# Altium PCB FURNACE.PcbDoc (part 2 of 2)
Units mm, origin at the board's own origin, x right, y up, seen from the top; angles counter-clockwise.
Board outline 97.9 x 85.9 mm, 2 copper layers (Top Layer, Bottom Layer); 165 components, 104 nets, 476 pads, 472 vias.
Unrouted connection lines stored in the file: 26.
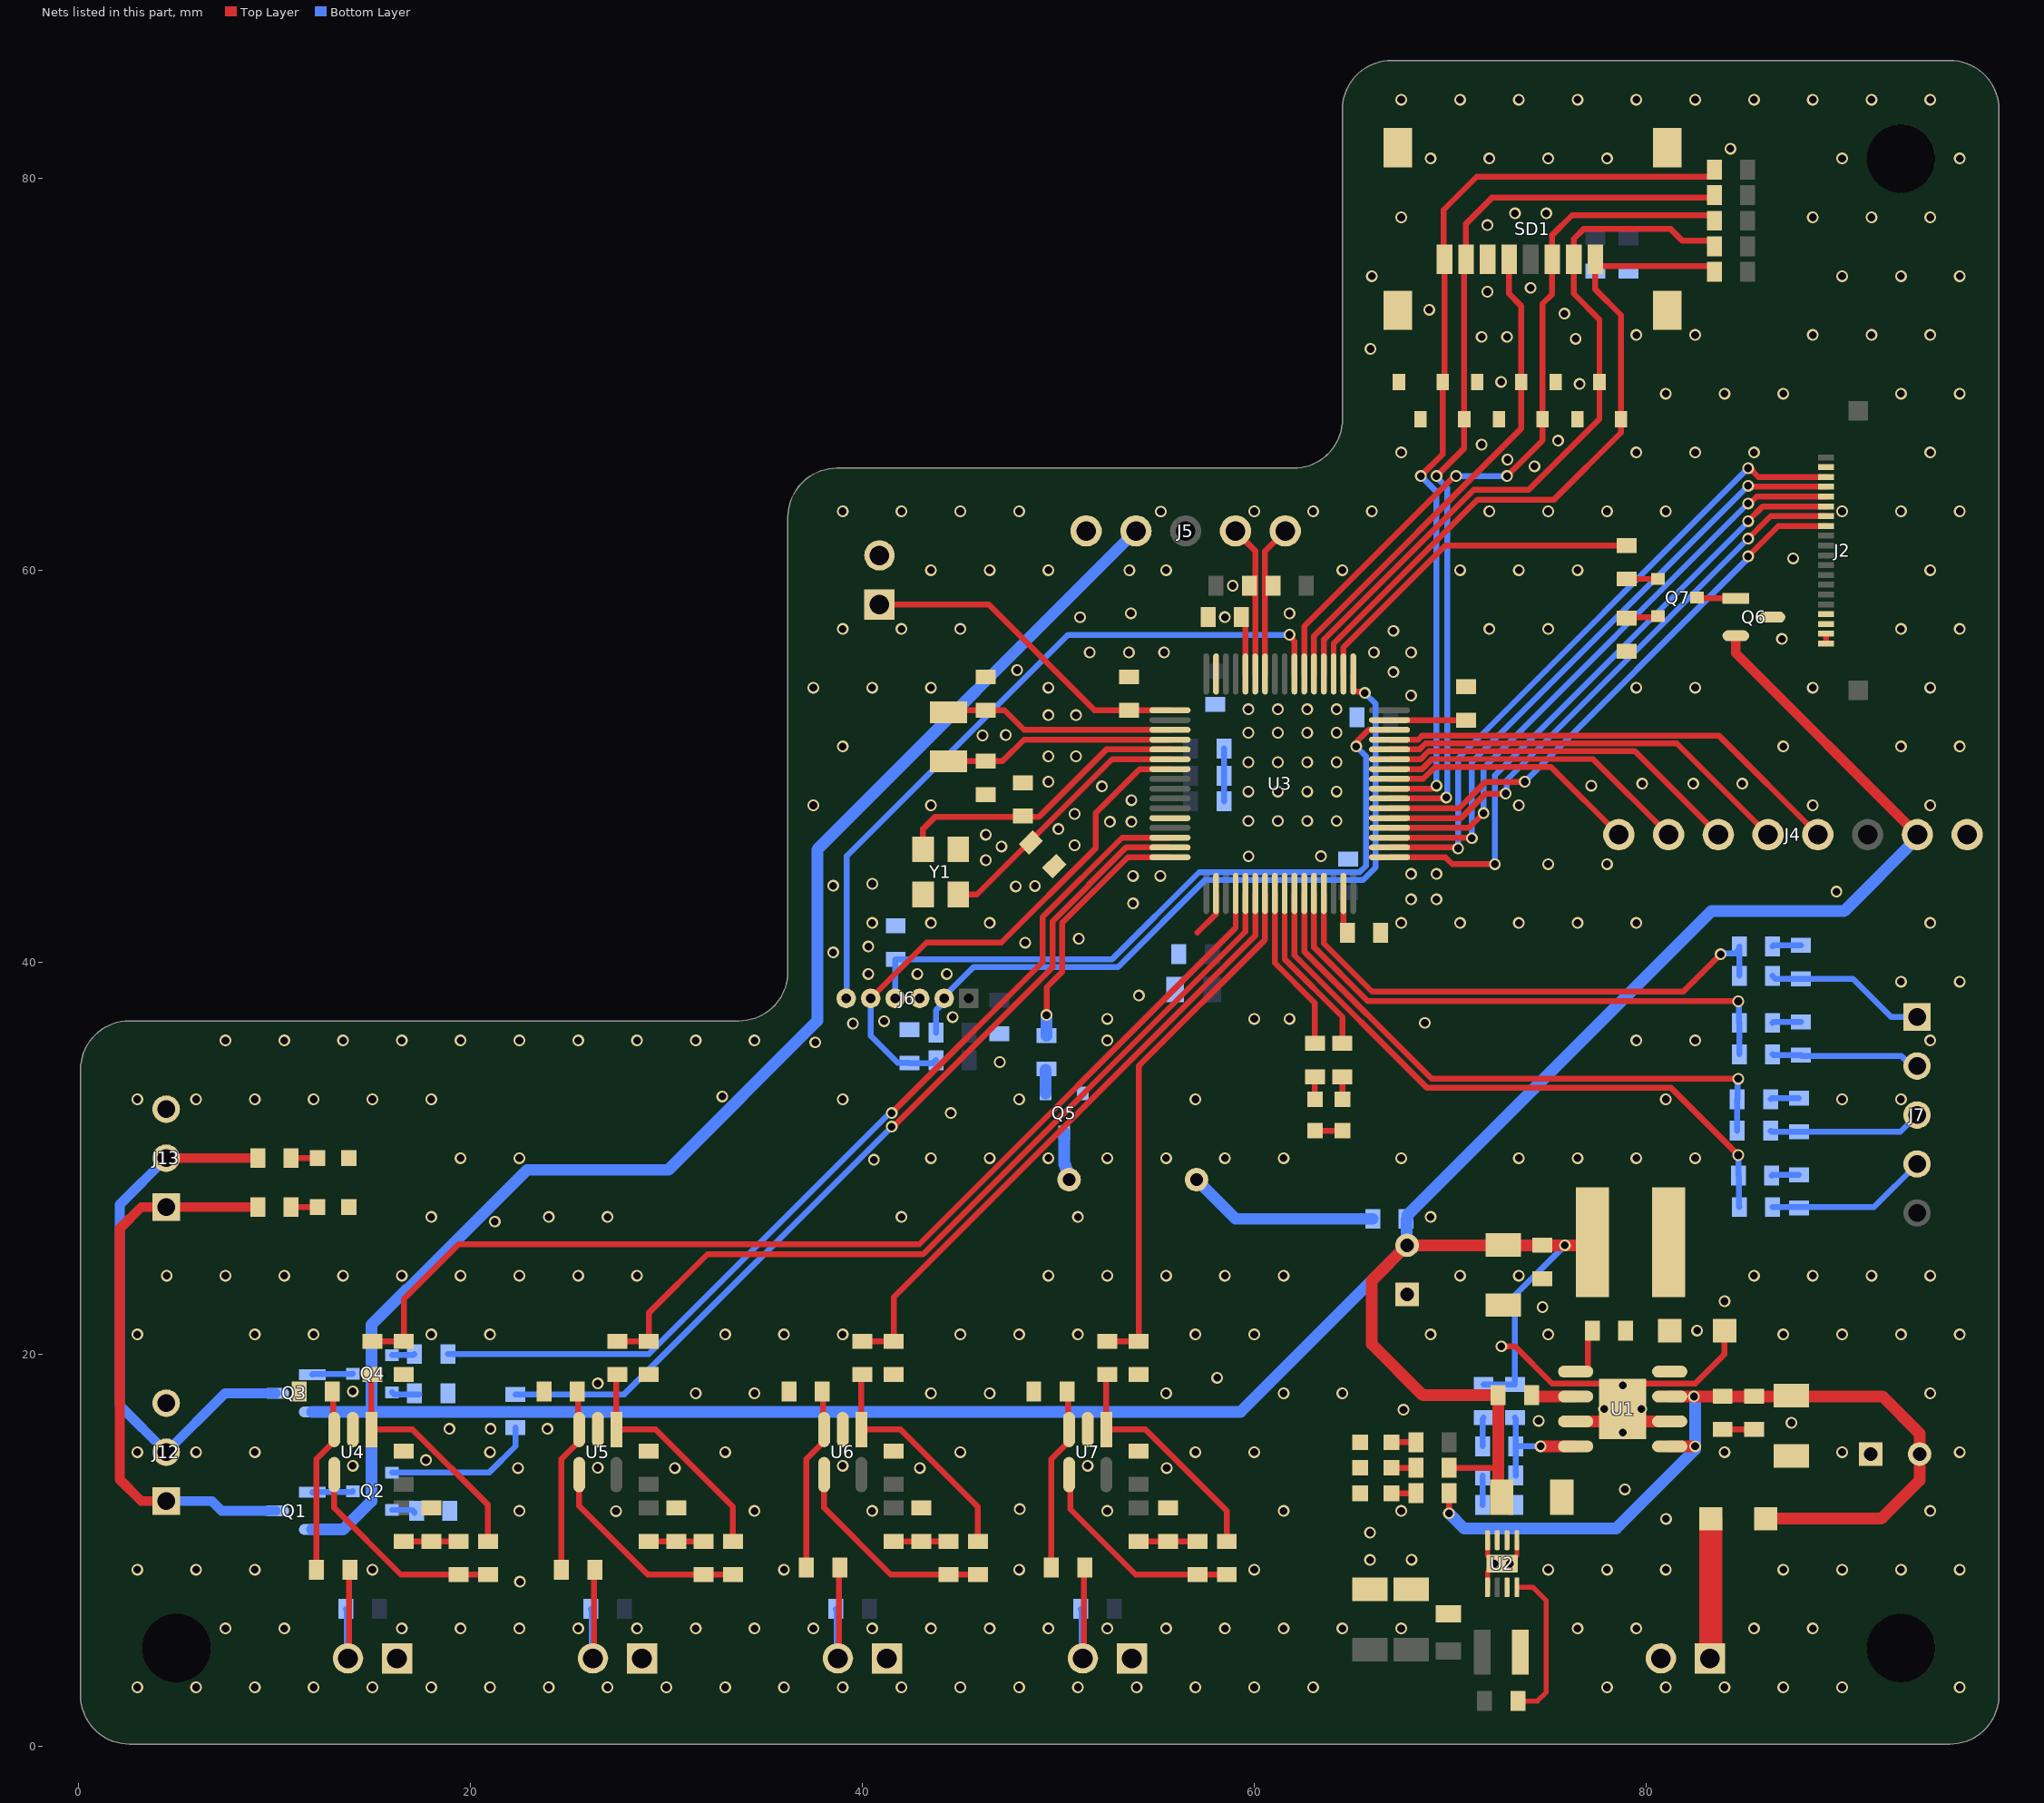
[diagram p2: the nets of this part, all layers, seen from the top]

## Via types
v1: diameter 0.6, hole 0.4, Top Layer to Bottom Layer, tented both sides, 472 vias

## Nets (pads, with @x,y where several pads share a name; then routed paths per layer and width w, separated by ;. In a path a pad name is that pad's centre, name@x,y a point inside that pad or via, vN(x,y) a via of type N, cw(c..) or ccw(c..) an arc to the next point about the centre after c; other vN are vias at no path point) (continued)
5V: C2.2 C4.2 C8.1 C9.1 C10.1 J4.7 J5.4 L1.2 Q1.2 Q3.2 Q6.2 R2.2 R3.2 R8.2 R69.1 U2.2 U2.3 | length 223.4
  Top Layer w0.3: R8.2@69.95,14.2 72.45,14.2 ; C10.1@72.4,12.475 C10.1@72.625,12.7
  Top Layer w0.5: Q6.2@84.575,56.65 84.575,55.765 J4.7@93.84,46.5
  Top Layer w0.6: C10.1@72.725,12.7 72.45,12.975 72.45,14.2 R3.2@72.45,17.9 68.6,17.9 66,20.5 66,23.75 C4.2@67.8,25.55 C8.1@74.7,25.55 75.85,25.55 v1(75.851,25.549) 77.099,25.549 L1.2@77.25,25.7
  Bottom Layer w0.3: R2.2@71.7,18.45 C2.2@73.3,18.45 73.3,22.997 v1(75.851,25.549)
  Bottom Layer w0.6: Q1.2@11.925,11.05 13.5,11.05 14.95,12.5 14.95,17.05 ; Q3.2@11.925,17.05 14.95,17.05 ; J5.4@53.96,62 37.7,45.74 37.7,37 30.1,29.4 22.89,29.4 16.79,23.3 16.75,23.3 14.95,21.5 14.95,17.05 ; J4.7@93.84,46.5 93.84,46.34 90.1,42.6 83.323,42.6 67.831,27.108 67.831,26.931 67.775,26.875 67.775,25.575 C4.2@67.8,25.55 59.3,17.05 14.95,17.05
BACKLIGHT_LCD: J2.3 J2.4 Q6.3
BACKLIGHT_SIGNAL: R71.1 U3.50 | length 18
  Top Layer w0.3: U3.50@64.55,54.7 64.55,56.05 69.75,61.25 R71.1@79,61.25
BUTTON1: J7.4 R18.1 R19.2 | length 8.3
  Bottom Layer w0.3: R18.1@86.45,27.5 91.625,27.5 J7.4@93.825,29.7
BUTTON2: J7.3 R20.1 R21.2 | length 7.8
  Bottom Layer w0.3: R20.1@86.35,31.4 86.4,31.35 R21.2@87.8,31.35 92.975,31.35 J7.3@93.825,32.2
BUTTON3: J7.2 R22.1 R23.2 | length 7.6
  Bottom Layer w0.3: R22.1@86.45,35.3 86.5,35.25 R23.2@87.9,35.25 87.95,35.2 93.027,35.2 93.527,34.7 J7.2@93.825,34.7
BUTTON4: J7.1 R24.1 R25.2 | length 8.2
  Bottom Layer w0.3: R24.1@86.45,39.3 86.6,39.15 R25.2@87.9,39.15 90.55,39.15 92.401,37.299 92.5,37.2 J7.1@93.825,37.2
CLK: D10.1 SD1.5 U3.53 | length 25.8
  Top Layer w0.3: U3.53@63.05,54.7 63.05,56.65 73.615,67.215 D10.1@73.615,69.6 73.615,73.485 73.005,74.095 SD1.5@73.005,75.85
CMD: D13.1 R66.1 SD1.3 U3.54 | length 38
  Top Layer w0.3: U3.54@62.55,54.7 62.55,57.131 70.219,64.8 v1(70.3,64.8) ; v1(72.9,64.8) 74.715,66.615 D13.1@74.715,67.7 74.715,73.59 75.205,74.08 SD1.3@75.205,75.85 75.205,77.095 76.21,78.1 83.244,78.1 83.475,77.869 R66.1@83.475,77.825
  Bottom Layer w0.3: v1(70.3,64.8) v1(72.9,64.8)
DAT0: D12.1 R65.1 SD1.7 U3.39 | length 46.3
  Top Layer w0.3: U3.39@66.9,48.35 69.75,48.35 v1(69.8,48.4) ; v1(69.3,64.8) 70.715,66.215 70.715,75.76 SD1.7@70.805,75.85 70.805,77.68 72.125,79 83.35,79 R65.1@83.475,79.125
  Bottom Layer w0.3: v1(69.3,64.8) 69.3,64.739 69.85,64.189 69.85,48.45 v1(69.8,48.4)
DAT1: D11.1 R64.1 SD1.8 U3.40 | length 47.5
  Top Layer w0.3: U3.40@66.9,48.85 69.069,48.85 69.219,49 v1(69.3,49) ; v1(68.5,64.8) 69.615,65.915 69.615,69.51 69.705,69.6 SD1.8@69.705,75.85 SD1.8@69.615,75.76 ; SD1.8@69.66,75.85 69.66,78.385 71.35,80.075 83.244,80.075 83.475,80.306 R64.1@83.475,80.425
  Bottom Layer w0.3: v1(68.5,64.8) 69.3,64 v1(69.3,49)
DAT2: D15.1 R68.1 SD1.1 U3.51 | length 36.5
  Top Layer w0.3: U3.51@64.05,54.7 64.05,56.25 71.4,63.6 75.3,63.6 78.711,67.011 78.711,67.696 D15.1@78.715,67.7 78.715,73.01 77.405,74.32 SD1.1@77.405,75.85 77.405,75.75 77.655,75.5 83.244,75.5 83.475,75.269 R68.1@83.475,75.225
DAT3: D14.1 R67.1 SD1.2 U3.52 | length 38
  Top Layer w0.3: U3.52@63.55,54.7 63.55,56.45 71.2,64.1 74,64.1 77.615,67.715 D14.1@77.615,69.6 77.615,72.785 76.305,74.095 SD1.2@76.305,75.85 76.305,76.905 76.8,77.4 81.25,77.4 81.85,76.8 83.244,76.8 83.475,76.569 R67.1@83.475,76.525
FAN_OUT: J12.2 J13.2 Q3.3 R62.2 | length 28.5
  Top Layer w0.5: J13.2@4.475,30 R62.2@9.15,30
  Bottom Layer w0.5: J13.2@4.475,30 2.1,27.625 2.1,17.375 J12.2@4.475,15 7.475,18 Q3.3@10.075,18
GND: C3.1 C4.1 C5.2 C6.2 C7.2 C8.2 C9.2 C10.2 C11.2 C12.2 C13.2 C14.2 C15.2 C16.2 C17.2 C18.2 C19.2 C20.2 C21.2 C22.2 C23.2 C24.2 C25.2 C26.2 C27.2 C28.2 C29.2 C30.2 C31.2 C32.2 C33.2 C34.2 C35.2 C36.2 C37.2 C38.2 C39.2 C40.2 C41.2 C42.2 C43.2 C44.2 D2.2 D3.2 D4.2 D5.2 D6.2 D7.2 D8.2 D9.2 D10.2 D11.2 D12.2 D13.2 D14.2 D15.2 J1.2 J2.1 J2.2 J2.19 J3.2 J4.8 J5.5 J6.3 J8.1 J9.1 J10.1 J11.1 J12.3 J13.3 Q5.2 R5.1 R14.1 R17.1 R19.1 R21.1 R23.1 R25.1 R30.1 R33.1 R38.1 R41.1 R46.1 R49.1 R54.1 R57.1 R60.1 R63.1 R72.1 SD1.6 SD1.9 SD1.10 SD1.11 SD1.12 U1.3 U1.6 U1.9 U2.1 U2.4 U2.5 U2.9 U3.12 U3.18 U3.63 U4.2 U5.2 U6.2 U7.2 Y1.2 Y1.4 | length 37.7
  Top Layer w0.25: U2.5@71.9,8.1 71.9,8.519 71.9,8.9 72.25,9.25 v1(72.25,9.3) 72.25,9.35 71.9,9.7 U2.4@71.9,10.5 ; U2.9@73.057,9.357 73.4,9.7 U2.1@73.4,10.5
  Top Layer w0.3: 57.1,41.5 58.05,42.45 U3.18@58.05,43.5 ; D7.2@63.1,31.4 D6.2@64.5,31.4 ; v1(72.61,20.395) 73.305,20.395 75.2,18.5 78.8,18.5 82.5,18.5 84,20 D2.2@84,21.2 ; U1.9@78.165,16.565 U1.9@78.8,17.2 U1.9@79.435,16.565 ; C7.2@83.9,16.15 C6.2@85.5,16.15 ; J2.1@89.176,56.25 J2.2@89.176,56.75
  Top Layer w0.6: U1.3@76.4,16.565 U1.9@78.165,16.565 ; U1.9@79.435,16.565 U1.6@81.2,16.565
  Bottom Layer w0.3: C30.2@58.45,48.2 C29.2@58.45,49.5 C28.2@58.45,50.9 ; C32.2@86.35,33 86.4,33.05 R21.1@87.8,33.05 ; C31.2@86.4,29.1 86.45,29.15 R19.1@87.8,29.15 ; C33.2@86.45,36.9 86.5,36.95 R23.1@87.9,36.95 ; C34.2@86.45,40.8 86.5,40.85 R25.1@87.9,40.85
  other v1: 3,3 6,3 9,3 12,3 15,3 18,3 21,3 24,3 27,3 30,3 33,3 36,3 39,3 42,3 45,3 48,3 51,3 54,3 57,3 60,3 63,3 78,3 81,3 84,3 87,3 90,3 96,3 7.5,6 10.5,6 16.5,6 19.5,6 22.5,6 25.5,6 28.5,6 31.5,6 34.5,6 37.5,6 40.5,6 43.5,6 46.5,6 49.5,6 52.5,6 55.5,6 58.5,6 61.5,6 64.5,6 67.5,6 76.5,6 79.5,6 85.5,6 88.5,6 22.529,8.388 3,9 6,9 9,9 15,9 36,9 48,9 60,9 75,9 78,9 81,9 87,9 90,9 93,9 96,9 73.05,9.3 65.91,9.495 68.024,9.512 65.91,10.895 81.01,11.595 22.5,12 27.429,11.988 34.5,12 40.5,12 52.5,12 61.5,12 67.5,12 94.5,12 48.029,12.088 78.91,13.095 22.429,14.188 26.5,14.2 30.429,14.188 42.929,14.188 55.529,14.188 14,14.3 39,14.3 51.5,14.3 17.729,14.588 3,15 6,15 9,15 21,15 33,15 45,15 57,15 60,15 84,15 90,15 96,15 78.8,16 18.929,16.188 21.029,16.188 23.929,16.188 87.41,16.495 74.51,16.595 67.613,17.16 77.85,17.2 79.75,17.2 31.5,18 34.5,18 43.5,18 46.5,18 55.5,18 61.5,18 64.5,18 94.5,18 14,18.1 78.8,18.4 26.5,18.5 58.11,18.795 3,21 9,21 12,21 18,21 21,21 33,21 36,21 39,21 45,21 48,21 51,21 57,21 60,21 69,21 75,21 87,21 90,21 93,21 96,21 82.6,21.2 74.71,22.395 84,22.7 4.5,24 7.5,24 10.5,24 13.5,24 16.5,24 19.5,24 22.5,24 25.5,24 28.5,24 49.5,24 52.5,24 55.5,24 58.5,24 61.5,24 70.5,24 73.5,24 85.5,24 88.5,24 91.5,24 94.5,24 21.24,26.76 18,27 24,27 27,27 42,27 51,27 69,27 40.589,29.911 19.5,30 22.5,30 43.5,30 46.5,30 49.5,30 52.5,30 55.5,30 58.5,30 61.5,30 67.5,30 73.5,30 76.5,30 79.5,30 82.5,30 44.51,32.295 3,33 6,33 9,33 12,33 15,33 18,33 39,33 48,33 57,33 81,33 90,33 93,33 32.855,33.145 47.01,34.895 37.595,35.905 7.5,36 10.5,36 13.5,36 16.5,36 19.5,36 22.5,36 25.5,36 28.5,36 31.5,36 34.5,36 52.5,36 79.5,36 82.5,36 94.5,36 39.518,36.864 68.7,36.9 41.11,36.987 52.5,37.1 60,37.1 61.8,37.1 44.61,37.195 54.11,38.295 93,39 96,39 40.31,39.395 42.81,39.395 44.31,39.395 38.51,40.495 40.31,40.795 48.31,40.995 51.05,41.195 40.5,42 43.5,42 46.5,42 67.5,42 70.5,42 73.5,42 76.5,42 79.5,42 94.5,42 53.81,42.995 68,43.2 69.3,43.2 89.71,43.595 47.831,43.862 38.51,43.895 48.807,43.885 40.51,43.995 53.81,44.395 55.21,44.395 68,44.5 69.3,44.5 75,45 78,45 46.3,45.2 59.71,45.395 63.4,45.4 47.1,45.9 50.831,45.962 46.3,46.5 50.007,46.785 52.631,47.162 53.731,47.162 59.7,47.2 61.2,47.2 62.7,47.2 64.2,47.2 50.831,47.562 37.5,48 43.5,48 73.5,48 88.5,48 94.5,48 53.731,48.262 59.7,48.7 61.2,48.7 62.7,48.7 64.2,48.7 52.231,48.962 77.2,49 79.8,49.1 82.4,49.1 84.9,49.1 49.5,49.2 59.7,50.2 61.2,50.2 62.7,50.2 64.2,50.2 49.5,50.5 50.9,50.5 39,51 87,51 93,51 96,51 46.131,51.562 47.323,51.589 59.7,51.7 61.2,51.7 62.7,51.7 64.2,51.7 49.5,52.6 50.9,52.6 59.7,52.9 61.2,52.9 62.7,52.9 64.2,52.9 68,53.6 37.5,54 40.5,54 43.5,54 49.5,54 79.5,54 82.5,54 88.5,54 94.5,54 67.1,54.8 47.9,54.9 51.6,55.8 53.6,55.8 55.4,55.8 66.1,55.8 68,55.8 86.929,56.488 67.1,56.9 39,57 42,57 45,57 72,57 75,57 93,57 96,57 51.11,57.595 58.5,57.6 61.8,57.792 53.7,57.8 58.9,59.2 43.5,60 46.5,60 49.5,60 53.629,59.988 55.5,60 64.5,60 70.5,60 73.5,60 76.5,60 94.5,60 87.5,60.6 39,63 42,63 45,63 48,63 55.229,62.988 60,63 63,63 66,63 72,63 75,63 78,63 81,63 90,63 93,63 96,63 74.3,65.3 72.927,65.639 67.5,66 79.5,66 82.5,66 85.5,66 94.5,66 71.6,66.4 75.5,66.6 81,69 84,69 87,69 93,69 96,69 76.6,69.5 72.6,69.6 65.929,71.288 76.4,71.8 71.6,71.9 72.9,71.9 79.5,72 82.5,72 88.5,72 91.5,72 94.5,72 75.829,73.088 68.929,73.288 71.9,74.2 74.1,74.4 66,75 90,75 93,75 96,75 71.9,77.6 67.5,78 88.5,78 91.5,78 94.5,78 73.3,78.2 74.9,78.2 69,81 72,81 75,81 78,81 90,81 96,81 84.3,81.5 67.5,84 70.5,84 73.5,84 76.5,84 79.5,84 82.5,84 85.5,84 88.5,84 91.5,84 94.5,84
HEAT_OUT: J12.1 J13.1 Q1.3 R59.2 | length 28.9
  Top Layer w0.5: J12.1@4.475,12.5 3.2,12.5 2.1,13.6 2.1,26.4 3.2,27.5 J13.1@4.475,27.5 R59.2@9.15,27.5
  Bottom Layer w0.5: J12.1@4.475,12.5 6.8,12.5 7.3,12 Q1.3@10.075,12
I2C_SCL: J5.1 R10.1 U3.58 | length 7.7
  Top Layer w0.3: U3.58@60.55,54.7 60.55,60 60.55,60.97 J5.1@61.58,62
I2C_SDA: J5.2 R11.1 U3.59 | length 7.7
  Top Layer w0.3: J5.2@59.04,62 60.05,60.99 60.05,60 60.05,59.3 U3.59@60.05,54.7
LCD_INT: J2.14 U3.37 | length 29
  Top Layer w0.3: U3.37@66.9,47.35 70.55,47.35 71.8,48.6 v1(72.83,48.6) ; v1(85.2,61.6) 86.35,62.75 J2.14@89.176,62.75
  Bottom Layer w0.3: v1(72.83,48.6) 72.887,48.657 72.887,49.287 v1(85.2,61.6)
LCD_MISO: J2.17 U3.35 | length 32
  Top Layer w0.3: U3.35@66.9,46.35 71.07,46.35 v1(71.1,46.32) ; v1(85.2,64.3) 85.25,64.25 J2.17@89.176,64.25
  Bottom Layer w0.3: v1(71.1,46.32) 71.1,50.2 v1(85.2,64.3)
LCD_MOSI: J2.16 U3.36 | length 30.6
  Top Layer w0.3: U3.36@66.9,46.85 70.95,46.85 v1(71.7,47.6) ; v1(85.2,63.4) 85.281,63.4 85.631,63.75 J2.16@89.176,63.75
  Bottom Layer w0.3: v1(71.7,47.6) 71.7,49.9 v1(85.2,63.4)
LCD_RST: J2.13 U3.38 | length 28.3
  Top Layer w0.3: U3.38@66.9,47.85 70.45,47.85 71.8,49.2 v1(73.8,49.2) ; v1(85.2,60.7) 86.75,62.25 J2.13@89.176,62.25
  Bottom Layer w0.3: v1@73.806,49.206 85.143,60.543 85.143,60.63 v1@85.206,60.694
LCD_SCLK: J2.18 U3.34 | length 33.2
  Top Layer w0.3: U3.34@66.9,45.85 70.35,45.85 v1(70.4,45.8) ; v1(85.2,65.2) 85.281,65.2 85.731,64.75 J2.18@89.176,64.75
  Bottom Layer w0.3: v1(70.4,45.8) 70.4,50.4 v1(85.2,65.2)
LCD_SPI_CS: J2.15 U3.33 | length 32.7
  Top Layer w0.3: U3.33@66.9,45.35 69.75,45.35 70.1,45 v1(72.28,45) ; v1(85.2,62.5) 85.95,63.25 J2.15@89.176,63.25
  Bottom Layer w0.3: v1@72.28,45.009 72.28,49.53 85.2,62.45 v1(85.2,62.5)
LED1: R15.2 U3.25 | length 8.9
  Top Layer w0.3: U3.25@61.55,43.5 61.55,40.15 64.5,37.2 R15.2@64.5,35.85
LED2: R16.2 U3.24 | length 8.5
  Top Layer w0.3: U3.24@61.05,43.5 61.05,39.95 63.1,37.9 R16.2@63.1,35.85
NetB1_1: B1.1 R69.2 | length 9.8
  Bottom Layer w0.6: B1.1@57.05,28.9 59.05,26.9 R69.2@66.05,26.9
NetB1_2: B1.2 Q5.3 | length 2.5
  Bottom Layer w0.6: Q5.3@50.3,31.3 50.3,29.692 50.36,29.632 50.36,29.514 50.435,29.439 50.435,29.015 B1.2@50.55,28.9
NetC1_1: C1.1 U1.1 | length 2.7
  Top Layer w0.3: U1.1@76.4,19.105 76.886,19.105 77.025,19.244 77.025,20.975 C1.1@77.25,21.2
NetC1_2: C1.2 D2.1 L1.1 U1.8
NetC2_1: C2.1 R1.1 R4.2 U1.4 | length 6
  Top Layer w0.6: v1(74.61,15.295) U1.4@76.4,15.295
  Bottom Layer w0.3: C2.1@73.3,16.75 73.35,16.7 R1.1@73.35,15.3 ; R4.2@73.35,13.8 R1.1@73.35,15.3 ; v1(74.61,15.295) 73.355,15.295 R1.1@73.35,15.3
NetC17_1: C17.1 U3.47 | length 3.9
  Top Layer w0.3: U3.47@66.9,52.35 C17.1@70.8,52.35
NetC18_1: C18.1 U3.31 | length 2.1
  Top Layer w0.3: U3.31@64.55,43.5 64.55,41.7 C18.1@64.75,41.5
NetC31_1: C31.1 R18.2 U3.26 | length 32.7
  Top Layer w0.3: U3.26@62.05,43.5 62.05,40.35 68.8,33.6 81.25,33.6 v1(84.7,30.15)
  Bottom Layer w0.3: v1(84.7,30.15) C31.1@84.7,29.1 84.725,29.075 84.725,27.525 R18.2@84.75,27.5
NetC32_1: C32.1 R20.2 U3.27 | length 30.5
  Top Layer w0.3: U3.27@62.55,43.5 62.55,40.55 69.05,34.05 v1(84.7,34.05)
  Bottom Layer w0.3: R20.2@84.65,31.4 C32.1@84.65,33 84.675,33.025 84.675,34.025 v1(84.7,34.05)
NetC33_1: C33.1 R22.2 U3.28 | length 28.3
  Top Layer w0.3: U3.28@63.05,43.5 63.05,40.75 65.8,38 v1(84.7,38)
  Bottom Layer w0.3: v1(84.7,38) 84.725,37.975 84.725,36.925 C33.1@84.75,36.9 R22.2@84.75,35.3
NetC34_1: C34.1 R24.2 U3.29 | length 27.3
  Top Layer w0.3: U3.29@63.55,43.5 63.55,40.95 66,38.5 81.9,38.5 v1(83.8,40.4)
  Bottom Layer w0.3: v1(83.8,40.4) 83.842,40.442 84.519,40.442 84.75,40.673 C34.1@84.75,40.8 R24.2@84.75,39.3
NetC36_1: C36.1 R29.2 U3.20 | length 55.8
  Top Layer w0.3: R29.2@15,20.65 C36.1@16.6,20.65 16.6,22.8 19.4,25.6 42.9,25.6 59.05,41.75 U3.20@59.05,43.5
NetC38_1: C38.1 R37.2 U3.21 | length 43.5
  Top Layer w0.3: R37.2@27.5,20.65 C38.1@29.1,20.65 29.1,22.1 32.1,25.1 43.1,25.1 59.55,41.55 U3.21@59.55,43.5
NetC40_1: C40.1 R45.2 U3.22 | length 32.1
  Top Layer w0.3: R45.2@40,20.65 C40.1@41.6,20.65 41.6,22.9 60.05,41.35 U3.22@60.05,43.5
NetC42_1: C42.1 R53.2 U3.23 | length 27.1
  Top Layer w0.3: R53.2@52.5,20.65 C42.1@54.1,20.65 54.1,34.7 60.55,41.15 U3.23@60.55,43.5
NetD3_1: D3.1 R7.1 | length 1.2
  Top Layer w0.3: D3.1@67,12.9 R7.1@68.25,12.9
NetD4_1: D4.1 R8.1 | length 1.2
  Top Layer w0.3: D4.1@67,14.2 R8.1@68.25,14.2
NetD5_1: D5.1 R9.1 | length 1.2
  Top Layer w0.3: D5.1@67,15.5 R9.1@68.25,15.5
NetD6_1: D6.1 R15.1 | length 1.2
  Top Layer w0.3: D6.1@64.5,33 R15.1@64.5,34.15
NetD7_1: D7.1 R16.1 | length 1.1
  Top Layer w0.3: D7.1@63.1,33 R16.1@63.1,34.15
NetD8_1: D8.1 R59.1 | length 1.3
  Top Layer w0.3: R59.1@10.85,27.5 D8.1@12.2,27.5
NetD9_1: D9.1 R62.1 | length 1.3
  Top Layer w0.3: R62.1@10.85,30 D9.1@12.2,30
NetJ8_2: J8.2 R26.1 R28.1 | length 7.1
  Top Layer w0.3: J8.2@13.75,4.475 13.8,4.525 13.8,8.95 R28.1@13.85,9
  Bottom Layer w0.3: R26.1@13.65,7 13.7,6.95 13.7,4.525 J8.2@13.75,4.475
NetJ9_2: J9.2 R34.1 R36.1 | length 7.1
  Top Layer w0.3: J9.2@26.25,4.475 26.3,4.525 26.3,8.95 R36.1@26.35,9
  Bottom Layer w0.3: R34.1@26.15,7 26.2,6.95 26.2,4.525 J9.2@26.25,4.475
NetJ10_2: J10.2 R42.1 R44.1 | length 7.2
  Top Layer w0.3: J10.2@38.75,4.475 38.8,4.525 38.8,9.05 R44.1@38.85,9.1
  Bottom Layer w0.3: R42.1@38.65,7 38.7,6.95 38.7,4.525 J10.2@38.75,4.475
NetJ11_2: J11.2 R50.1 R52.1 | length 7.2
  Top Layer w0.3: J11.2@51.25,4.475 51.3,4.525 51.3,9.05 R52.1@51.35,9.1
  Bottom Layer w0.3: R50.1@51.15,7 51.2,6.95 51.2,4.525 J11.2@51.25,4.475
NetL2_1: L2.1 U2.7
NetQ1_1: Q1.1 Q2.3 | length 2.1
  Bottom Layer w0.3: Q1.1@11.925,12.95 11.95,12.975 13.975,12.975 Q2.3@14,13
NetQ2_1: Q2.1 R58.2 | length 7.8
  Bottom Layer w0.3: Q2.1@16,13.95 20.95,13.95 22.3,15.3 R58.2@22.3,16.25
NetQ2_2: Q2.2 R60.2 | length 1.2
  Bottom Layer w0.3: Q2.2@16,12.05 17.019,12.05 17.15,11.919 R60.2@17.15,11.9
NetQ3_1: Q3.1 Q4.3 | length 2.1
  Bottom Layer w0.3: Q3.1@11.925,18.95 11.95,18.975 13.975,18.975 Q4.3@14,19
NetQ4_1: Q4.1 R61.2 | length 1.2
  Bottom Layer w0.3: Q4.1@16,19.95 17.1,19.95 R61.2@17.15,20
NetQ4_2: Q4.2 R63.2 | length 1.4
  Bottom Layer w0.3: Q4.2@16,18.05 16.1,17.95 R63.2@17.4,17.95
NetQ5_1: Q5.1 R70.2 | length 1.3
  Bottom Layer w0.3: R70.2@49.35,34.5 R70.2@49.4,34.55
  Bottom Layer w0.6: Q5.1@49.35,33.3 R70.2@49.35,34.5
NetQ6_1: Q6.1 Q7.3 | length 2
  Top Layer w0.3: Q7.3@82.6,58.6 82.625,58.575 84.55,58.575 Q6.1@84.575,58.55
NetQ7_1: Q7.1 R71.2 | length 1.6
  Top Layer w0.3: R71.2@79,59.55 Q7.1@80.6,59.55
NetQ7_2: Q7.2 R72.2 | length 1.6
  Top Layer w0.3: R72.2@79,57.55 79.05,57.6 80.55,57.6 Q7.2@80.6,57.65
NetR1_2: R1.2 R2.1 | length 1.5
  Bottom Layer w0.3: R1.2@71.65,15.3 71.65,16.7 R2.1@71.7,16.75
NetR3_1: R3.1 U1.2 | length 2.3
  Top Layer w0.3: R3.1@74.15,17.9 R3.1@74.215,17.835
  Top Layer w0.6: R3.1@74.215,17.835 U1.2@76.4,17.835
NetR4_1: R4.1 R5.2 | length 1.5
  Bottom Layer w0.3: R5.2@71.65,12.3 R4.1@71.65,13.8
NetR6_1: R6.1 U2.8 | length 8.1
  Top Layer w0.25: U2.8@73.4,8.1 74.225,8.1 74.9,7.425 74.9,2.75 74.45,2.3 R6.1@73.45,2.3
NetR17_2: R17.2 U3.60 | length 3.3
  Top Layer w0.3: R17.2@59.25,57.9 59.25,57.773 59.55,57.473 U3.60@59.55,54.7
NetR27_2: R27.2 R30.2 R31.1 | length 2.8
  Top Layer w0.3: R27.2@16.6,10.45 R31.1@19.4,10.45
NetR28_2: R28.2 R33.2 U4.3 | length 9.5
  Top Layer w0.3: R28.2@12.15,9 12.15,14.654 13.05,15.554 U4.3@13.05,16.15 13,16.2 13,18.05 R33.2@12.95,18.1
NetR29_1: R29.1 R32.2 U4.1 | length 12.2
  Top Layer w0.3: R29.1@15,18.95 14.95,18.9 U4.1@14.95,16.15 17.05,16.15 20.9,12.3 R32.2@20.9,10.45
NetR31_2: R31.2 R32.1 U4.4 | length 11
  Top Layer w0.3: U4.4@13.05,13.85 13.05,12.15 16.45,8.75 R31.2@19.4,8.75 R32.1@20.9,8.75
NetR35_2: R35.2 R38.2 R39.1 | length 2.8
  Top Layer w0.3: R35.2@29.1,10.45 R39.1@31.9,10.45
NetR36_2: R36.2 R41.2 U5.3 | length 9.5
  Top Layer w0.3: R36.2@24.65,9 24.65,14.654 25.55,15.554 U5.3@25.55,16.15 25.5,16.2 25.5,18.05 R41.2@25.45,18.1
NetR37_1: R37.1 R40.2 U5.1 | length 12.2
  Top Layer w0.3: R37.1@27.5,18.95 27.45,18.9 U5.1@27.45,16.15 29.45,16.15 33.4,12.2 R40.2@33.4,10.45
NetR39_2: R39.2 R40.1 U5.4 | length 10.9
  Top Layer w0.3: U5.4@25.55,13.85 25.55,12.25 29.05,8.75 R39.2@31.9,8.75 R40.1@33.4,8.75
NetR43_2: R43.2 R46.2 R47.1 | length 2.8
  Top Layer w0.3: R43.2@41.6,10.45 R47.1@44.4,10.45
NetR44_2: R44.2 R49.2 U6.3 | length 9.4
  Top Layer w0.3: R44.2@37.15,9.1 37.15,14.654 38.05,15.554 U6.3@38.05,16.15 38,16.2 38,18.05 R49.2@37.95,18.1
NetR45_1: R45.1 R48.2 U6.1 | length 12.2
  Top Layer w0.3: R45.1@40,18.95 39.95,18.9 U6.1@39.95,16.15 41.95,16.15 45.9,12.2 R48.2@45.9,10.45
NetR47_2: R47.2 R48.1 U6.4 | length 11
  Top Layer w0.3: U6.4@38.05,13.85 38.05,12.15 41.45,8.75 R47.2@44.4,8.75 R48.1@45.9,8.75
NetR51_2: R51.2 R54.2 R55.1 | length 3
  Top Layer w0.3: R51.2@54.1,10.45 R55.1@57.1,10.45
NetR52_2: R52.2 R57.2 U7.3 | length 9.4
  Top Layer w0.3: R52.2@49.65,9.1 49.65,14.654 50.55,15.554 U7.3@50.55,16.15 50.5,16.2 50.5,18.05 R57.2@50.45,18.1
NetR53_1: R53.1 R56.2 U7.1 | length 12.3
  Top Layer w0.3: R53.1@52.5,18.95 52.45,18.9 U7.1@52.45,16.15 U7.1@52.6,16 ; U7.1@52.6,16.15 54.45,16.15 58.6,12 R56.2@58.6,10.45
NetR55_2: R55.2 R56.1 U7.4 | length 11.2
  Top Layer w0.3: U7.4@50.55,13.85 50.61,13.79 50.61,12.09 53.95,8.75 R55.2@57.1,8.75 R56.1@58.6,8.75
NetR58_1: R58.1 U3.15 | length 46.3
  Top Layer w0.3: v1(41.5,31.6) 41.578,31.6 49.7,39.722 49.7,42.066 51.551,43.916 51.551,43.951 53.45,45.85 U3.15@55.7,45.85
  Bottom Layer w0.3: R58.1@22.3,17.95 27.85,17.95 v1(41.5,31.6)
NetR61_1: R61.1 U3.14 | length 49.1
  Top Layer w0.3: v1(41.5,32.3) 49.2,40 49.2,42.3 53.25,46.35 U3.14@55.7,46.35
  Bottom Layer w0.3: R61.1@18.85,20 29.1,20 41.25,32.15 41.269,32.15 41.419,32.3 v1(41.5,32.3)
NetR70_1: R70.1 U3.16 | length 13
  Top Layer w0.3: v1(49.4,37.3) 49.4,38.7 50.2,39.5 50.2,42 53.55,45.35 U3.16@55.7,45.35
  Bottom Layer w0.6: R70.1@49.4,36.25 v1(49.4,37.3)
NRST: C16.1 J6.5 R13.1 U3.7 | length 27.1
  Top Layer w0.3: J6.5@40.425,38.15 43.275,41 47.1,41 51.9,45.8 51.9,47.6 54.15,49.85 U3.7@55.7,49.85
  Bottom Layer w0.3: J6.5@40.425,38.15 40.425,36.235 41.788,34.871 42.378,34.871 C16.1@42.4,34.85 43.6,34.85 R13.1@43.75,35
OSC32_N: C27.1 U3.4 Y2.2 | length 11.8
  Top Layer w0.3: Y2.2@44.4,50.25 47.15,50.25 48.25,51.35 U3.4@55.7,51.35
OSC32_P: C26.1 U3.3 Y2.1 | length 11.8
  Top Layer w0.3: Y2.1@44.4,52.75 44.5,52.85 47.25,52.85 48.25,51.85 54.8,51.85 U3.3@55.7,51.85
PH_N: C25.1 U3.6 Y1.3 | length 13.7
  Top Layer w0.3: Y1.3@44.9,43.45 45.843,43.45 52.743,50.35 U3.6@55.7,50.35
PH_P: C24.1 U3.5 Y1.1 | length 15.3
  Top Layer w0.3: Y1.1@43.1,45.75 43.1,46.8 43.7,47.4 49,47.4 52.45,50.85 U3.5@55.7,50.85
SWCLK: J6.2 R12.1 U3.49 | length 37.5
  Top Layer w0.3: J6.2@44.175,38.15 J6.2@44.175,38.254 ; U3.49@65.05,54.7 65.05,53.8 65.493,53.8 65.559,53.734 v1(65.64,53.734)
  Bottom Layer w0.3: R12.1@43.75,36.4 43.75,37.536 44.175,37.961 J6.2@44.175,38.15 44.175,38.254 45.671,39.75 53.05,39.75 57.481,44.181 65.539,44.181 66.2,44.842 66.2,53.174 v1(65.64,53.734)
SWDIO: J6.4 R14.2 U3.46 | length 36.4
  Top Layer w0.3: v1(65.2,51) 65.257,51.057 65.257,51.271 65.836,51.85 U3.46@66.9,51.85
  Bottom Layer w0.3: J6.4@41.675,38.15 R14.2@41.675,40.125 ; R14.2@41.7,40.15 52.75,40.15 57.181,44.581 65.374,44.581 65.7,44.907 65.7,50.5 v1(65.2,51)
SWO: J6.6 U3.55 | length 36.6
  Top Layer w0.3: v1(61.8,56.7) 61.8,56.619 62.05,56.369 U3.55@62.05,54.7
  Bottom Layer w0.3: J6.6@39.175,38.15 39.203,38.178 39.203,45.411 50.492,56.7 v1(61.8,56.7)
USART_CK: J4.1 U3.41 | length 13.4
  Top Layer w0.3: U3.41@66.9,49.35 68.625,49.35 69.235,49.96 75.14,49.96 J4.1@78.6,46.5
USART_CTS: J4.4 U3.44 | length 21.4
  Top Layer w0.3: U3.44@66.9,50.85 68.428,50.85 68.738,51.16 81.56,51.16 J4.4@86.22,46.5
USART_RTS: J4.5 U3.45 | length 24
  Top Layer w0.3: U3.45@66.9,51.35 68.362,51.35 68.572,51.56 83.7,51.56 J4.5@88.76,46.5
USART_RX: J4.3 U3.43 | length 18.7
  Top Layer w0.3: U3.43@66.9,50.35 68.494,50.35 68.904,50.76 79.42,50.76 J4.3@83.68,46.5
USART_TX: J4.2 U3.42 | length 16.1
  Top Layer w0.3: U3.42@66.9,49.85 68.559,49.85 69.069,50.36 77.28,50.36 J4.2@81.14,46.5
VBat_IN: C14.1 J3.1 U3.1 | length 17.1
  Top Layer w0.3: J3.1@40.875,58.25 46.45,58.25 51.85,52.85 C14.1@53.6,52.85 U3.1@55.7,52.85
Vin: D1.2 J1.1 | length 7.1
  Top Layer w0.3: J1.1@83.25,4.475 J1.1@83.3,4.525
  Top Layer w1.2: J1.1@83.3,4.525 D1.2@83.3,11.6
VIN_FILTERED: C3.2 C5.1 C6.1 C7.1 D1.1 R7.2 U1.5 U1.7 | length 44.2
  Top Layer w0.3: v1(69.935,11.877) 69.943,11.884 69.943,12.893 R7.2@69.95,12.9
  Top Layer w0.6: U1.5@81.2,15.295 v1(82.5,15.295) ; U1.7@81.2,17.835 C7.1@83.885,17.835 ; C7.1@83.9,17.843 85.493,17.843 85.5,17.835 87.4,17.835 92.065,17.835 93.95,15.95 C3.2@93.95,14.9 93.95,13.55 92.2,11.8 92,11.6 D1.1@86.1,11.6
  Bottom Layer w0.6: v1(69.935,11.877) 70.712,11.1 78.465,11.1 82.5,15.135 82.5,17.77 v1(82.435,17.835)
pads on no net: J2.5 J2.6 J2.7 J2.8 J2.9 J2.10 J2.11 J2.12 J2.MP1 J2.MP2 U3.2 U3.8 U3.9 U3.10 U3.11 U3.17 U3.30 U3.56 U3.57 U3.61 U3.62

## Polygon pours and split planes (outlines as drawn)
GND on Top Layer "GND_L01_P017" (solid, remove dead copper, pour order 17): 2.6,0.1 95.5,0.1 ccw(c95.5,2.6) 98,2.6 98,83.5 ccw(c95.5,83.5) 95.5,86 67,86 ccw(c67,83.527) 64.527,83.527 64.527,67.727 cw(c62,67.727) 62,65.2 38.7,65.2 ccw(c38.7,62.7) 36.2,62.7 36.2,39.5 cw(c33.7,39.5) 33.7,37 2.6,37 ccw(c2.6,34.5) 0.1,34.5 0.1,2.6 ccw(c2.6,2.6)
BACKLIGHT_LCD on Top Layer "BACKLIGHT_LCD_L01_P015" (solid, remove dead copper, pour order 15): 85.75,57.625 85.75,57.575 ccw(c86.025,57.575) 86.025,57.3 88.204,57.3 cw(c88.204,56.884) 88.498,57.178 88.535,57.142 ccw(c88.635,57.242) 88.635,57.1 89.575,57.1 89.575,57.9 86.025,57.9 ccw(c86.025,57.625)
5V on Top Layer "5V_L01_P011" (solid, remove dead copper, pour order 11): 72.325,10 72.975,10 ccw(c72.975,10.05) 73.025,10.05 73.025,11.354 cw(c73.377,11.354) 73.128,11.603 ccw(c72.894,11.837) 73.225,11.837 73.225,13.6 72.025,13.6 72.025,11.908 ccw(c72.527,11.908) 72.172,11.553 cw(c71.923,11.304) 72.275,11.304 72.275,10.05 ccw(c72.325,10.05)
NetL2_1 on Top Layer "NETL2_1_L01_P010" (solid, pour order 10): 72.825,8.6 72.975,8.6 cw(c72.975,8.55) 73.025,8.55 73.025,7.771 ccw(c73.316,7.771) 73.11,7.565 73.876,6.799 cw(c73.336,6.259) 74.1,6.259 74.1,3.7 cw(c73.95,3.7) 73.95,3.55 73.25,3.55 cw(c73.25,3.75) 73.05,3.75 73.05,6.796 ccw(c72.317,6.796) 72.835,7.315 cw(c72.981,7.46) 72.775,7.46 72.775,8.55 cw(c72.825,8.55)
NetC1_2 on Top Layer "NETC1_2_L01_P013" (solid, remove dead copper, pour order 13): 82,28.5 80.3,28.5 80.3,23.173 cw(c80.027,23.173) 80.027,22.9 ccw(c80.027,22.172) 79.512,22.687 78.55,21.725 78.55,20.675 78.998,20.675 cw(c78.998,19.826) 79.599,20.426 80.059,19.966 cw(c79.476,19.384) 80.3,19.384 80.3,19.1 ccw(c80.6,19.1) 80.6,18.8 81.802,18.8 ccw(c81.802,19.098) 82.1,19.102
3V3 on Top Layer "3V3_L01_P009" (solid, remove dead copper, pour order 9): 72.129,7.479 71.59,6.94 ccw(c72.773,5.757) 71.1,5.757 71.1,3.7 ccw(c71.25,3.7) 71.25,3.55 71.95,3.55 ccw(c71.95,3.75) 72.15,3.75 72.15,6.611 cw(c72.622,6.611) 72.288,6.945 ccw(c71.717,7.516) 72.525,7.516 72.525,8.55 ccw(c72.475,8.55) 72.475,8.6 72.325,8.6 ccw(c72.325,8.55) 72.275,8.55 72.275,7.831 cw(c71.778,7.831)
GND on Bottom Layer "GND_L02_P018" (solid, remove dead copper, pour order 18): 2.6,0.1 95.5,0.1 ccw(c95.5,2.6) 98,2.6 98,83.5 ccw(c95.5,83.5) 95.5,86 67,86 ccw(c67,83.5) 64.5,83.5 64.5,67.7 cw(c62,67.7) 62,65.2 38.7,65.2 ccw(c38.7,62.7) 36.2,62.7 36.2,39.5 cw(c33.7,39.5) 33.7,37 2.6,37 ccw(c2.6,34.5) 0.1,34.5 0.1,2.6 ccw(c2.6,2.6)

## Other copper
Top Layer:
  pour cut-out: 78.2,28.6 80.28,28.6 80.18,28.5 79.1,28.5
  pour cut-out: 78.2,22.8 78.214,22.814 79.486,22.814
  pour cut-out: 64.269,40.892 64.2,40.823 64.2,40.7
  pour cut-out: 76.2,78.9 76.21,78.89 76.21,78.1
  pour cut-out: 75.516,74.995 75.551,74.96 76.028,74.96
  pour cut-out: 74.139,49.427 74.139,49.539 74.3,49.7
  pour cut-out: 72.969,1.692 72.231,1.692 72.2,1.723 72.2,1.8

## Silkscreen, mask and mechanical layers (free items; w line width, h text height)
Top Overlay:
  drawing of 69 lines, arcs and shapes, not listed
  text "SCL SDA 3V3 5V GND" at 61.2,64.2 h1 r180
  text "GND VBat" at 37.5,61.6 h1 r270
  text "I2C Extension port" at 48.4,58.5 h1
  text "Warranty void" at 58.616,50.646 h1
  text "if removed" at 58.616,49.119 h1
  text "USART Extension port" at 86.6,49 h1
  text "CK TX RX CTS RTS 3V3 5V GND" at 80.6,44.4 h1
  text "3V3 / SWCLK / GND / SWDIO / NRST / SWO" at 39.803,35.7 h1 r270
  text "LEDS" at 3.5,35.411 h1
  text "GND FAN HEAT" at 0.811,33.1 h1 r270
  text "FAN" at 14.8,29.7 h1
  text "Bzzzzz..." at 52.3,28.6 h1
  text "LED1" at 64.8,28.298 h1 r90
  text "LED2" at 63.4,28.181 h1 r90
  text "AERO OVEN CONTROL BOARD / REV. B" at 26.085,27.7 h1
  text "HEAT" at 14.8,27.2 h1
  text "3V3 BUT1 BUT2 BUT3 BUT4" at 97.2,26.5 h1 r90
  text "SR40" at 3.6,20.511 h1
  text "GND FAN HEAT" at 0.711,18.4 h1 r270
  text "3V3" at 62.991,15.211 h1
  text "5V" at 63.353,13.911 h1
  text "Vin" at 63.276,12.6 h1
  text "T1 GND" at 13.3,1.111 h1
  text "T2 GND" at 25.9,1.111 h1
  text "T3 GND" at 38.4,1.111 h1
  text "T4 GND" at 50.9,1.111 h1
  text "GND Vin" at 80.1,1.111 h1
Bottom Overlay:
  text "Jeżeli czytasz ten tekst, znaczy to że piec nie piecuje i ktoś obwinia za to płytke." at 46.7,23.8 h1
Mechanical 1:
  lines w0.2: 95.471,86 67,86 ccw(c67,83.5) 64.5,83.5 64.5,67.7 cw(c62,67.7) 62,65.2 38.7,65.2 ccw(c38.7,62.7) 36.2,62.7 36.2,39.5 cw(c33.7,39.5) 33.7,37 2.6,37 ccw(c2.6,34.5) 0.1,34.5 0.1,2.6 ccw(c2.6,2.6) 2.6,0.1 95.5,0.1 ccw(c95.5,2.6) 98,2.6 98,83.5 ccw(c95.5,83.5) 95.5,86